# Altium PCB PCB_LED_Board_v2.1.PcbDoc
Units mm, origin at the board's own origin, x right, y up, seen from the top; angles counter-clockwise.
Board outline 38 x 15 mm, 3 copper layers (Aluminium, Dielectric, Copper Layer), stack 3.156 mm thick; 7 components, 5 nets, 13 pads, 0 vias.
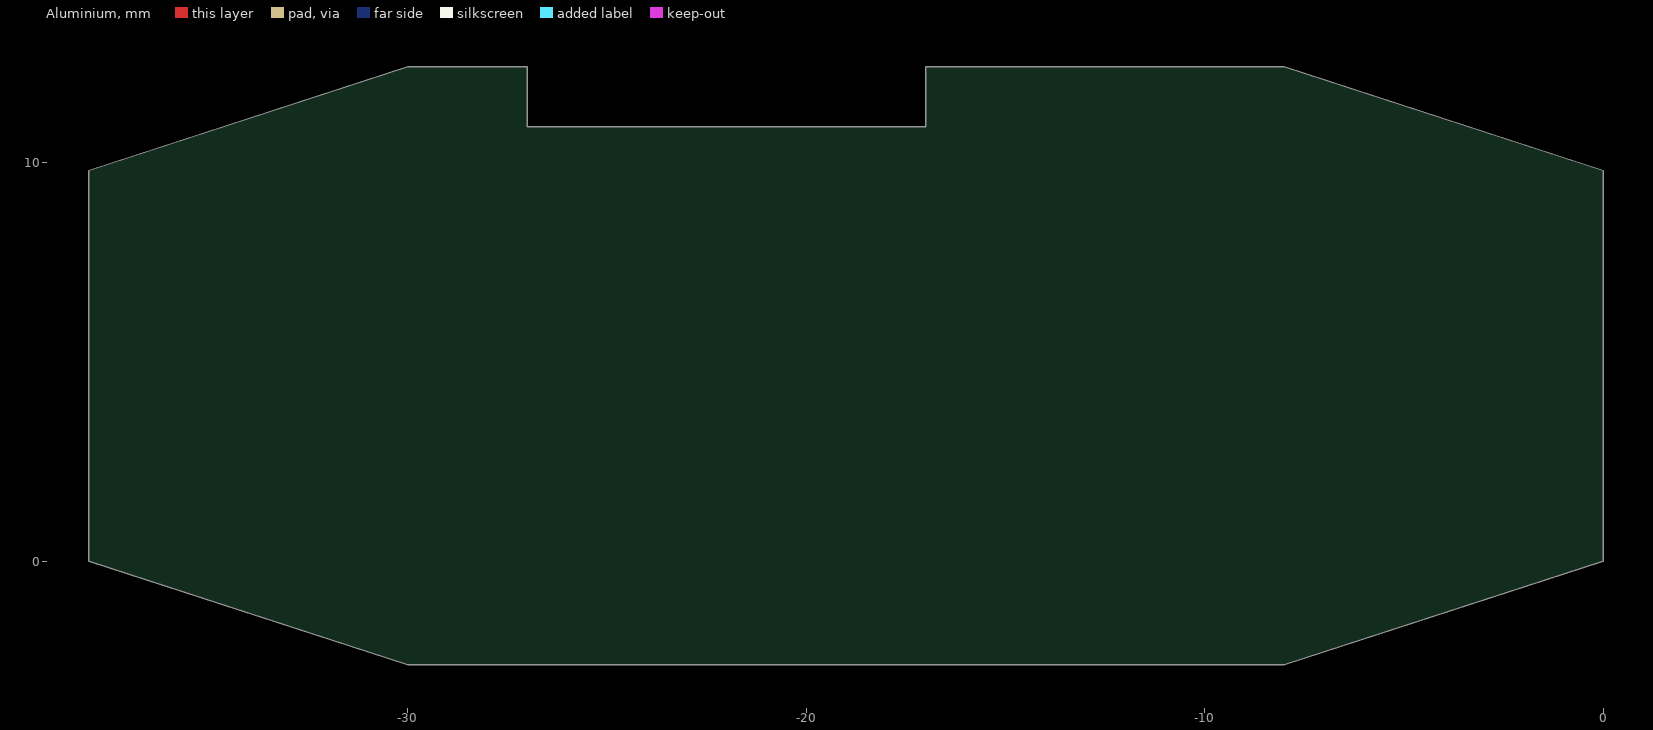
[diagram p0: Aluminium view]
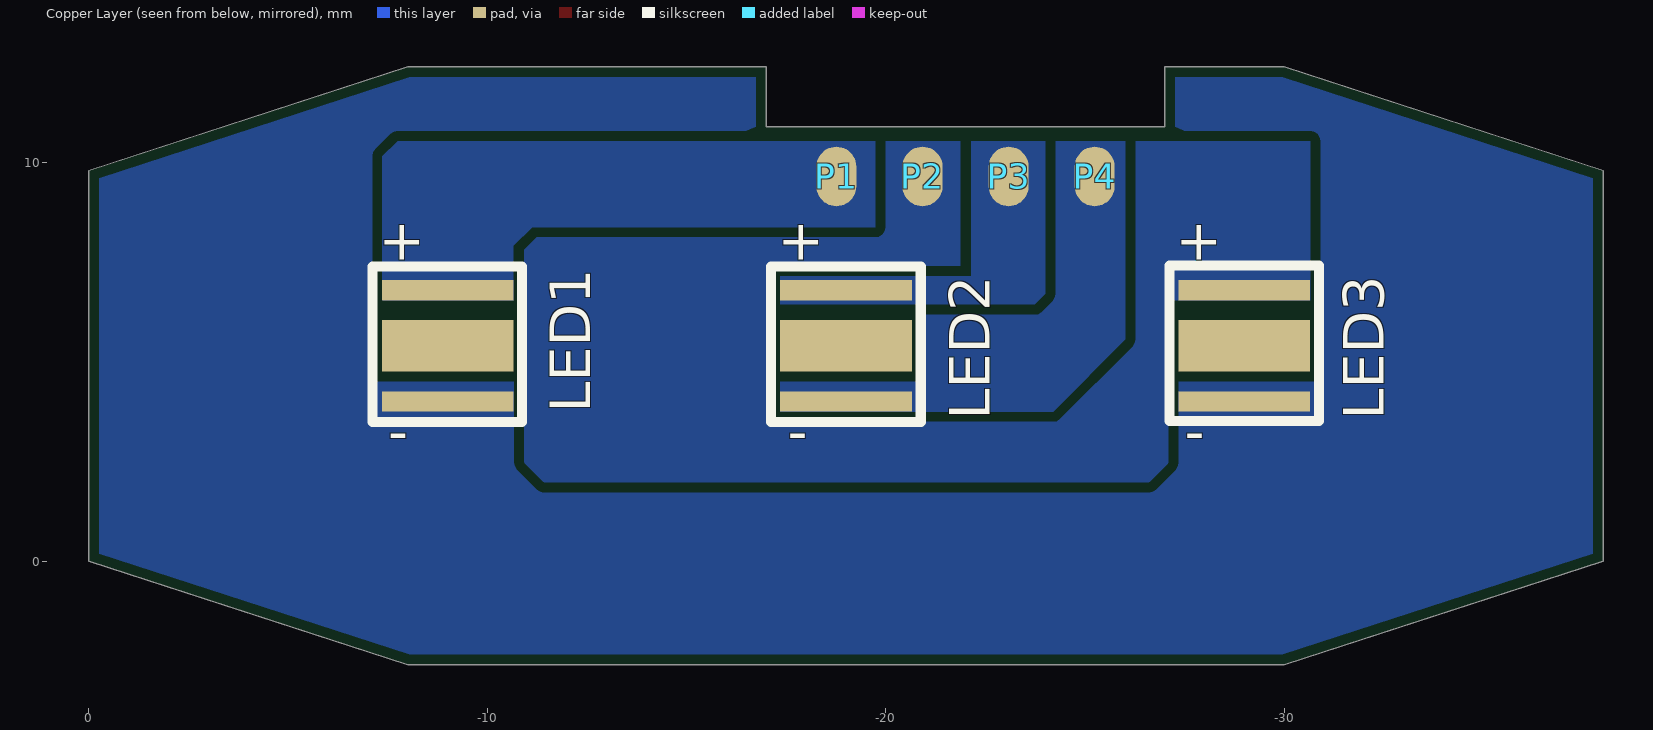
[diagram p1: Copper Layer view, seen from below]
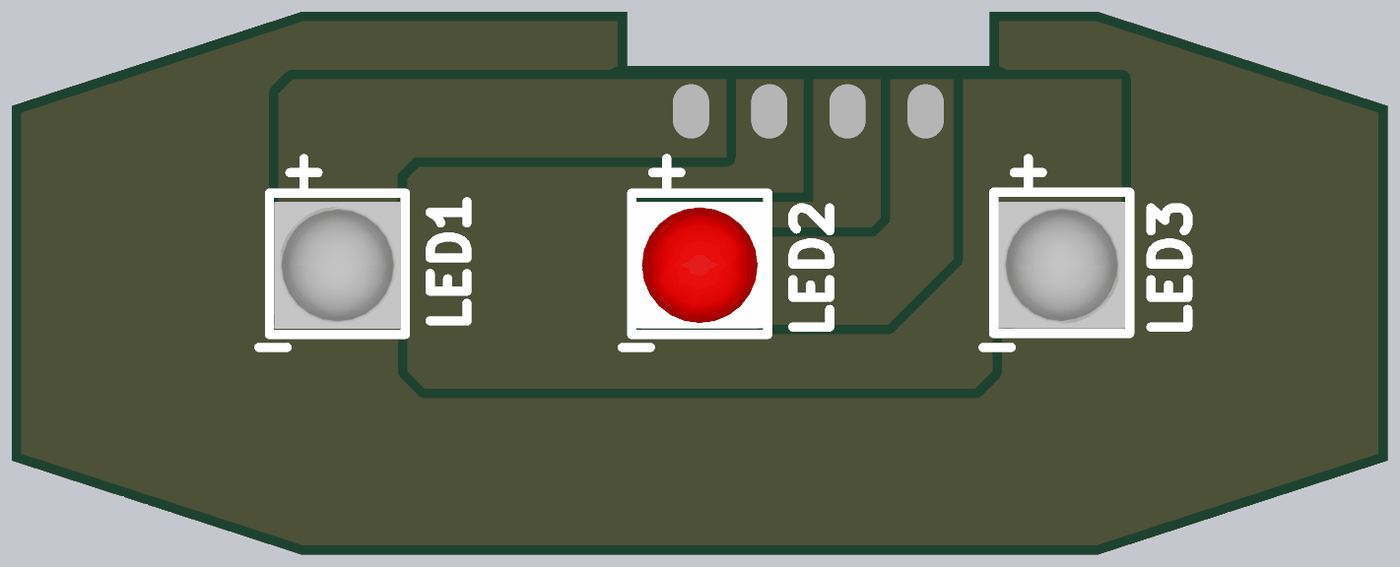
[diagram p2: 3D render of the assembled board from below, using the file's embedded part models]

## Layer stack, top to bottom
Board Layer Stack Top Solder: solder mask 0.0254, SM-001, Dk 4
Aluminium: signal copper 1.5
Aluminium: core 1.5, FR-4, Dk 4.8
Dielectric: signal copper 0.05
Dielectric 1: prepreg 0.0711, PP-006, Dk 4.1
Copper Layer: signal copper 0.035
Board Layer Stack Bottom Solder: solder mask 0.0254, SM-001, Dk 4

## Board outline
-38,0 -38,9.801 -30,12.401 -27,12.401 -27,10.901 -17,10.901 -17,10.902 -17,12.401 -8,12.401 0,9.801 0,0 -8,-2.599 -30,-2.599

## Design rules (kind name [scope] priority, off if disabled: settings)
BoardOutlineClearance [All] p1: gap=0 ignorepadtopadclearanceinfootprint=FALSE except(0.254: Poly-OutlineEdge)
Clearance [All] p1: gap=0.178 ignorepadtopadclearanceinfootprint=FALSE except(0.254: Arc-Poly Track-Poly SMDPad-Poly THPad-Poly Via-Poly Fill-Poly Poly-Poly)
FanoutControl Fanout_Default [All] p1: bgadir=Out bgaviamode=Centered fanoutstyle=Auto fanoutdirection=Alternating viagrid=0.025 // Fanout_Default (Default Rule)
FanoutControl Fanout_Small [(CompPinCount < 5)] p2: bgadir=Out bgaviamode=Centered fanoutstyle=Auto fanoutdirection=OutThenIn viagrid=0.025 // Fanout_Small (Default Rule)
FanoutControl Fanout_LCC [IsLCC] p4: bgadir=Out bgaviamode=Centered fanoutstyle=Auto fanoutdirection=Alternating viagrid=0.025 // Fanout_LCC (Default Rule)
FanoutControl Fanout_BGA [IsBGA] p5: bgadir=Out bgaviamode=Centered fanoutstyle=Auto fanoutdirection=Alternating viagrid=0.025 // Fanout_BGA (Default Rule)
HoleSize [All] p1: absolutevalues=TRUE maxlimit=25.4 minlimit=0.025 maxpercent=80.000 minpercent=20.000
HoleToHoleClearance [All] p1: gap=0 allowstackedmicrovias=TRUE
MinimumSolderMaskSliver [All] p1: minsoldermaskwidth=0
PlaneConnect [All] p1: planeconnectstyle=Direct reliefexpansion=0.508 reliefentries=4 reliefconductorwidth=0.254 reliefairgap=0.254
PolygonConnect [All] p1: connectstyle=Direct reliefconductorwidth=0.254 reliefentries=4 polygonreliefangle="90 Angle" airgapwidth=0.254
RoutingVias [All] p1: holewidth=0.3 width=0.6 viastyle="Through Hole" minholewidth=0.3 minwidth=0.6 maxholewidth=0.3 maxwidth=0.6
SilkToSilkClearance [All] p1: silktosilkclearance=0
SilkToSolderMaskClearance [IsPad] p1: minsilkscreentomaskgap=0 clearancetoexposedcopper=TRUE
SolderMaskExpansion Via [IsVia] p1: expansion=0 istentingtop=FALSE soldermaskfromhole=TRUE
SolderMaskExpansion SolderMaskExpansion_1 [Not IsVia] p2: expansion=0.102 istentingtop=FALSE
SupplyNets "Schematic Supply Nets" [InNet('VBATT')] p1: voltage=0.000
UnRoutedNet [All] p1: checkbadconnections=TRUE
Width [All] p1: maxlimit=2.54 minlimit=0.254 preferedwidth=0.381 midlayer1_maxwidth=0.254 midlayer1_prefwidth=0.254 minimp=50.000000 maximp=50.000000 favimp=50.000000
19 further rules are at their usual default settings.

## Components (designator, comment, footprint, x,y, rotation, side; value= is the part's Value field where it differs from the comment)
LED1 "White" LED_SPHWH2L3D30CD4QTP3 -9,5.401 r270 bottom
LED2 "RED" LED_SPHRD2L3DH20E7W41J -19,5.401 r270 bottom
LED3 "White" LED_SPHWH2L3D30CD4QTP3 -29,5.401 r90 bottom
P1 "TEST POINT" Test-point#1 -18.161,9.572 r180 bottom
P2 "TEST POINT" Test-point#2 -20.676,9.601 r180 bottom
P3 "TEST POINT" Test-point#3 -23.19,9.652 r180 bottom
P4 "TEST POINT" Test-point#4 -25.273,9.724 r180 bottom

## Footprints (in the part's own frame and the unit in brackets; to place one, negate y for a bottom-side part, rotate by r counter-clockwise, add the part's x,y. Pads: shape width x height; smd on the part's side, far side on the other; paste and mask are expansions set on the pad)
LED_SPHRD2L3DH20E7W41J [mil] "LED LH351H DEEP RED 638NM"
  rect 20x130 smd paste+0 mask+0: 1(-55,0) 2(55,0)
  rect 51x130 smd paste+0 mask+0: 3(0,0)
  body extent -69,-69 69,69, height 80
LED_SPHWH2L3D30CD4QTP3 [mil] "LED Lighting LH351B White, Cool 5700K"
  rect 20x130 smd paste+0 mask+0: 1(-55,0) 2(55,0)
  rect 51x130 smd paste+0 mask+0: 3(0,0)
  body extent -69,-69 69,69, height 75
Test-point#1 [mm]
  oval 1x1.5 smd: 1(0.599,0.08)
Test-point#2 [mm]
  oval 1x1.5 smd: 1(0.244,0.051)
Test-point#3 [mm]
  oval 1x1.5 smd: 1(-0.11,0)
Test-point#4 [mm]
  oval 1x1.5 smd: 1(-0.033,-0.072)

## Part data
LED1 LED3: library part SPHWH2L3D30CD4QTP3, "LED Lighting LH351B White, Cool 5700K 2.8V 350mA 120° 1414 (3535 Metric)", Digikey Part Number=1510-2143-6-ND, Manufacturer="Samsung Semiconductor, Inc.", Package="0.138\" L x 0.138\" W (3.50mm x 3.50mm)", ComponentLink1Description="Digikey Link", ComponentLink1URL=https://www.digikey.com/en/products/detail/samsung-semiconductor-inc/SPHWH2L3D30CD4QTP3/6569391, Item Type=LED, Manufacturer Part Number=SPHWH2L3D30CD4QTP3
LED2: library part SPHRD2L3DH20E7W41J, "LED Lighting Color LH351H Red 660nm (650nm ~ 670nm)", Digikey Part Number=1510-SPHRD2L3DH20E7W41JDKR-ND, Manufacturer="Samsung Semiconductor, Inc.", Package="0.138\" L x 0.138\" W (3.50mm x 3.50mm)", ComponentLink1Description="Digikey Link", ComponentLink1URL=https://www.digikey.com/en/products/detail/samsung-semiconductor-inc/SPHRD2L3DH20E7W41J/13617167?s=N4IgTCBcDaIMoAUASAlAImAMgZjUsADAKIDsA6gCwCMAUiALoC%2BQA, Item Type=LED, Manufacturer Part Number=SPHRD2L3DH20E7W41J
P1 P2 P3 P4: "Test Point ON", Item Type="TEST POINT"

## Nets (pads, with @x,y where several pads share a name; then routed paths per layer and width w, separated by ;. In a path a pad name is that pad's centre, name@x,y a point inside that pad or via, vN(x,y) a via of type N, cw(c..) or ccw(c..) an arc to the next point about the centre after c; other vN are vias at no path point)
LED_R_NEG: LED2.2 P4.1
LED_W_NEG: LED3.2 P2.1
LED_W_POS: LED1.1 P1.1
NetLED1_2: LED1.2 LED3.1
VBATT: LED2.1 P3.1
pads on no net: LED1.3 LED2.3 LED3.3

## Polygon pours and split planes (outlines as drawn)
NetLED1_2 on Copper Layer "NETLED1_2_L03_P022" (solid, pour order 22): -38,0 -38,9.801 -30,12.401 -27,12.401 -27,10.901 -17,10.901 -17,10.902 -17,12.401 -8,12.401 0,9.801 0,0 -8,-2.599 -30,-2.599
LED_W_NEG on Copper Layer "LED_W_NEG_L03_P021" (solid, pour order 21): -30.651,6.544 -27.12,6.544 -27.12,2.126 -26.711,1.718 -11.313,1.718 -10.922,2.108 -10.922,8.179 -11.125,8.382 -19.914,8.382 -19.914,10.541 -21.869,10.541 -21.869,7.153 -17.349,7.153 -17.349,3.75 -24.501,3.75 -26.111,5.359 -26.111,10.541 -30.651,10.541
LED_R_NEG on Copper Layer "LED_R_NEG_L03_P020" (solid, pour order 20): -23.266,10.541 -23.266,8.667 -19.219,4.619 -17.349,4.624 -17.349,3.75 -24.197,3.75 -26.01,5.563 -26.01,10.541
VBATT on Copper Layer "VBATT_L03_P019" (solid, pour order 19): -24.003,10.541 -22.139,10.541 -22.139,7.153 -17.349,7.153 -17.349,6.44 -23.737,6.44 -24.003,6.706
LED_W_POS on Copper Layer "LED_W_POS_L03_P018" (solid, pour order 18): -19.736,10.541 -19.736,8.382 -11.125,8.382 -10.651,7.908 -10.651,6.544 -7.349,6.544 -7.366,6.561 -7.366,10.16 -7.747,10.541
NetLED1_2 on Copper Layer "NETLED1_2_L03_P013" (solid, remove dead copper, pour order 13): -27.349,4.537 -27.349,2.355 -26.711,1.718 -11.313,1.718 -10.651,2.379 -10.651,4.511 -7.349,4.511 -7.349,-0.288 -7.782,-0.721 -30.166,-0.721 -30.651,-0.235 -30.651,4.537

## Silkscreen, mask and mechanical layers (free items; w line width, h text height)
Board Layer Stack Bottom Overlay:
  lines w0.254: -30.873,3.512 -27.12,3.512 -27.12,7.417 -30.873,7.417 -30.873,3.512 ; -20.876,3.486 -17.122,3.486 -17.122,7.391 -20.876,7.391 -20.876,3.486 ; -10.868,3.486 -7.115,3.486 -7.115,7.391 -10.868,7.391 -10.868,3.486
  text "+" at -27.277,7.56 h1.02
  text "+" at -17.292,7.56 h1.02
  text "+" at -7.273,7.56 h1.02
  text "-" at -28.009,3.526 h1.02 r180
  text "-" at -18.046,3.526 h1.02 r180
  text "-" at -8.009,3.526 h1.02 r180
Dimensions:
  circle w0.254: c-8.995,5.377 r1.696
  circle w0.254: c-19.003,5.377 r1.696
  circle w0.254: c-28.992,5.391 r1.696
Board Shape:
  the board outline again, w0.254

## Dimensions
-27,12.401 to -30.687,5.391 on Dimensions
-30,-2.599 to -30,12.401 on Dimensions
0,9.801 to -38,9.801 on Dimensions